# EAGLE board Cricket Game Board (EAGLE 9.6.2)
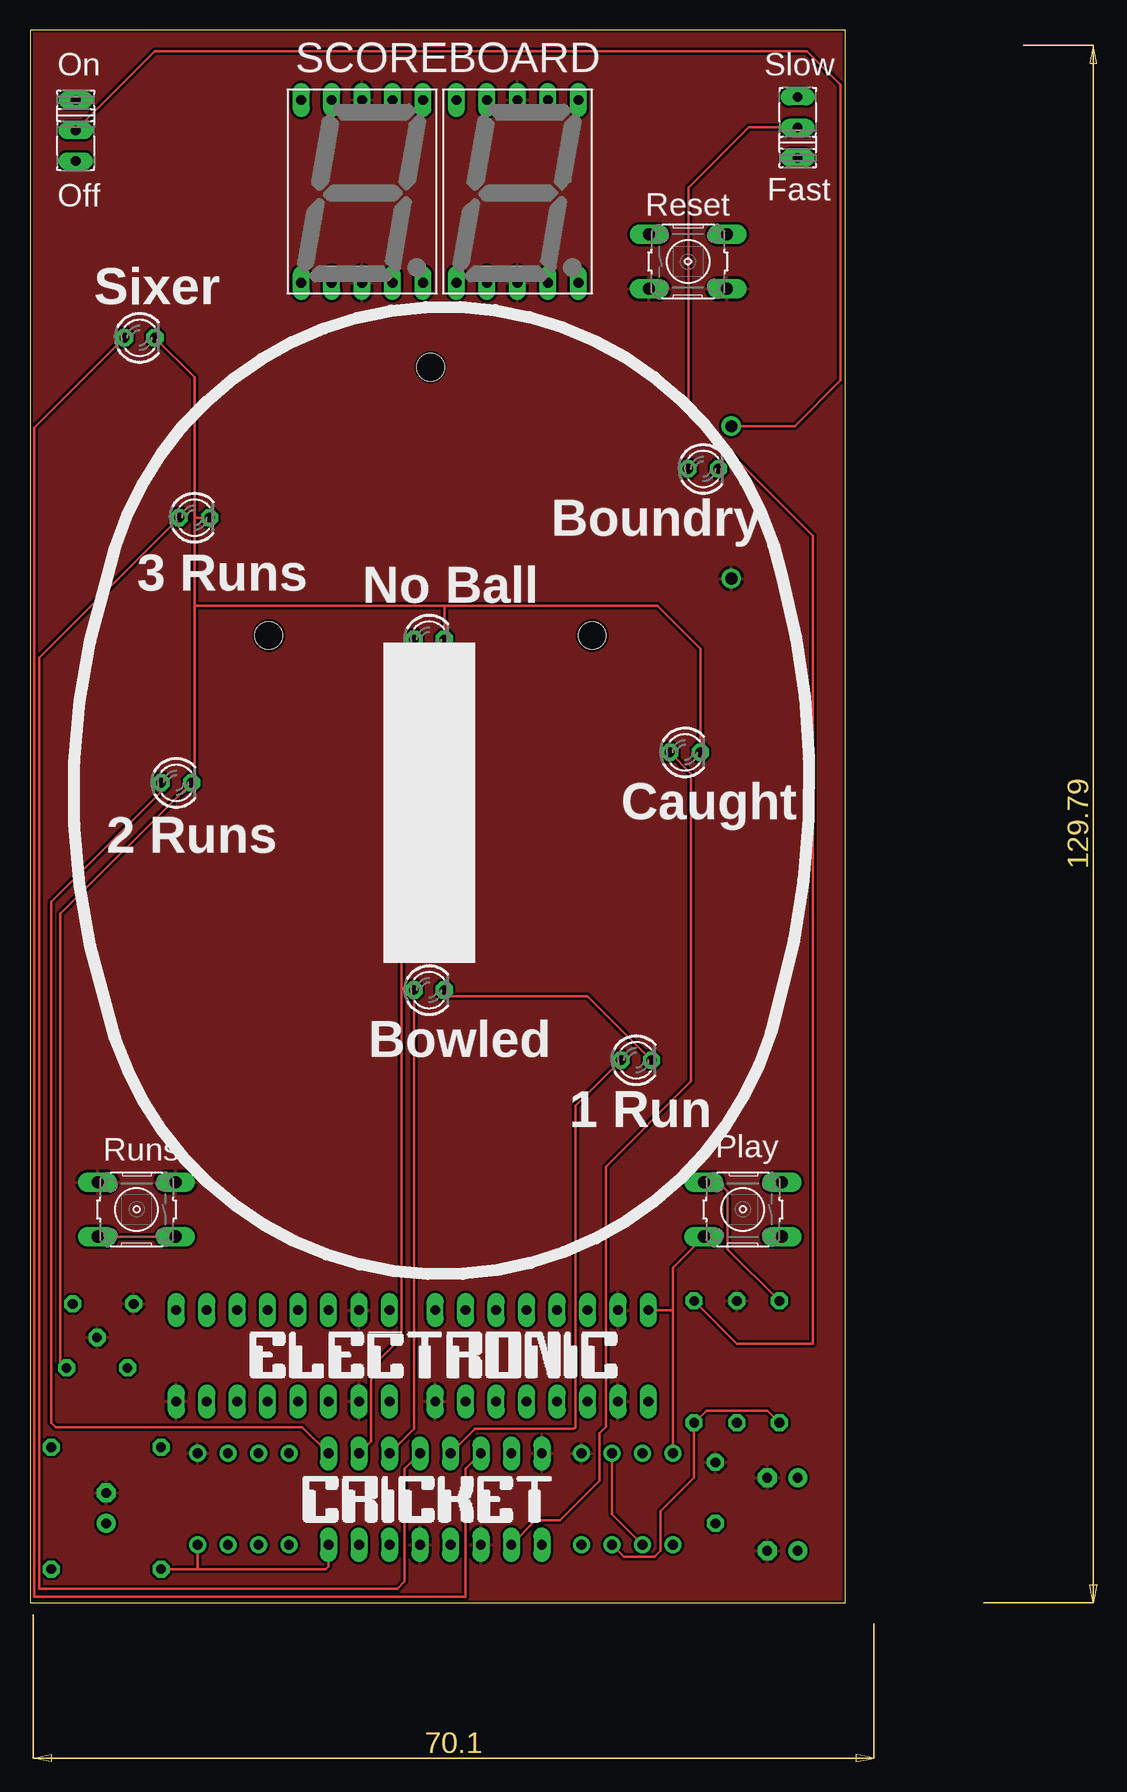
[diagram p0: board, top side]
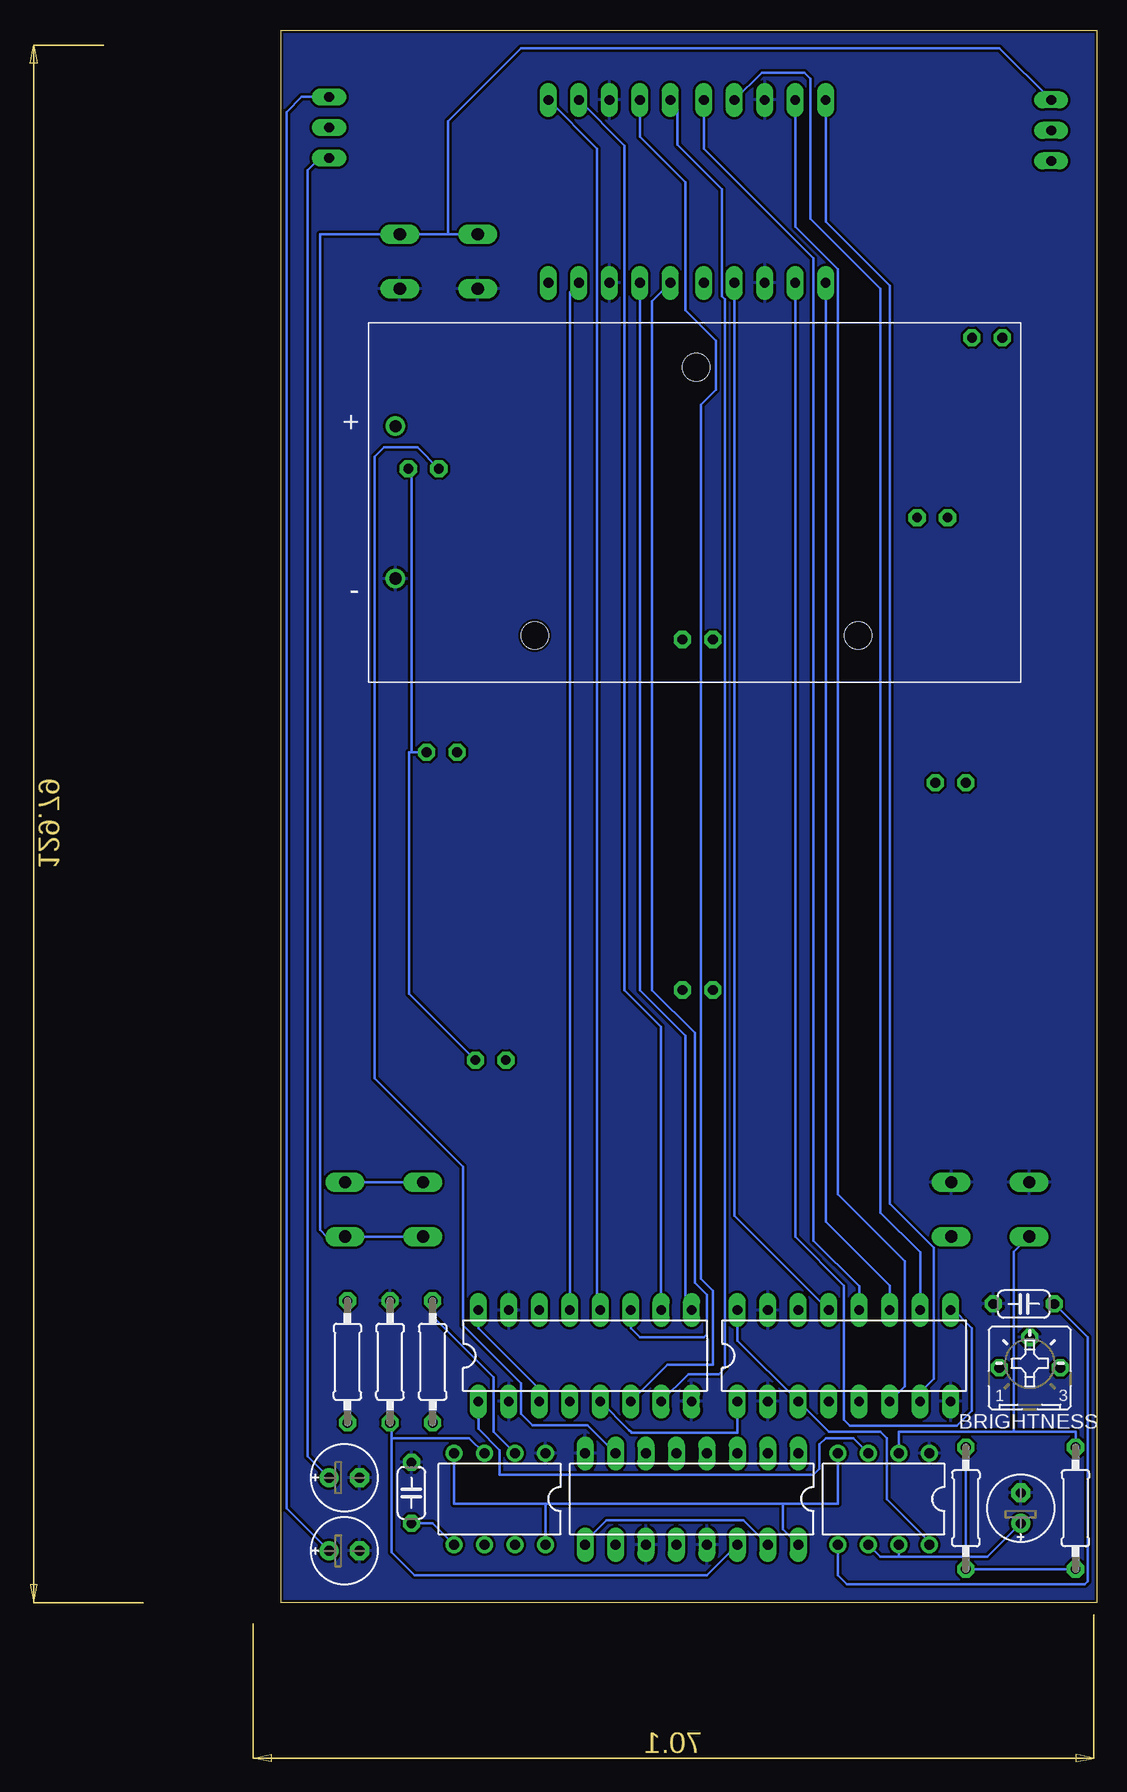
[diagram p1: board, bottom side, seen from below]

Size 68 x 131.05 mm. Coordinates in mm from the lower left corner, seen from the top.
Outline: 0,0 68,0 68,131.05 0,131.05 0,0
Copper layers (1*16): Top 0.035mm / dielectric 1.5mm / Bottom 0.035mm
Design rules "SparkFun": minimum track width 8mil, minimum drill 20mil, track to track 8mil, track to pad 8mil, pad to pad 8mil, via to via 8mil, smd to smd 8mil, copper to edge 8mil, drill to drill 8mil, minimum pad ring 12mil, minimum via ring 10mil, stop-mask expansion 4mil, vias tented up to drill 20mil, thermal gap 10mil

## Footprints (pad centres in the part's own frame; a part is rotated, then mirrored left to right if it is on the bottom)
B25P = drill 0.813 octagon: A -2.54,0; E 2.54,0; S 0,2.54
BAT_BH9VPC = drill 1.016: + 24.945,-6.35; - 24.945,6.35 | hole 2.29: -0.135,-11.26; -13.625,11.09; 13.345,11.09
E2,5-6E = drill 0.813 pad 1.575: + -1.27,0 | drill 0.813 pad 1.575 octagon: - 1.27,0
C050-024X044 = drill 0.813 octagon: 1 -2.54,0; 2 2.54,0
HDSP-M = drill 0.813 long: 1 -5.08,-7.62; 2 -2.54,-7.62; 3 0,-7.62; 4 2.54,-7.62; 5 5.08,-7.62; 6 5.08,7.62; 7 2.54,7.62; 8 0,7.62; 9 -2.54,7.62; 10 -5.08,7.62
M251 = drill 0.813 long: 1 -2.54,0; 2 0,0; 3 2.54,0
DIL08 = drill 0.813 pad 1.27: 1 -3.81,-3.81; 2 -1.27,-3.81; 3 1.27,-3.81; 4 3.81,-3.81; 5 3.81,3.81; 6 1.27,3.81; 7 -1.27,3.81; 8 -3.81,3.81
DIL16 = drill 0.813 long: 1 -8.89,-3.81; 2 -6.35,-3.81; 3 -3.81,-3.81; 4 -1.27,-3.81; 5 1.27,-3.81; 6 3.81,-3.81; 7 6.35,-3.81; 8 8.89,-3.81; 9 8.89,3.81; 10 6.35,3.81; 11 3.81,3.81; 12 1.27,3.81; 13 -1.27,3.81; 14 -3.81,3.81; 15 -6.35,3.81; 16 -8.89,3.81
LED3MM = drill 0.813 octagon: A -1.27,0; K 1.27,0
B3F-10XX = drill 1.016 long: 1 -3.251,2.261; 2 3.251,2.261; 3 -3.251,-2.261; 4 3.251,-2.261
0207/10 = drill 0.813 octagon: 1 -5.08,0; 2 5.08,0

## Placement (x,y rotation side)
BRIGHTNESS  5k  [B25P]  5.59,19.56 0 bottom
BT1  BH9VPC  [BAT_BH9VPC]  33.53,91.69 180 bottom
C1  1uf  [E2,5-6E]  62.74,10.41 0 bottom
C2  3.3uf  [E2,5-6E]  62.74,4.32 0 bottom
C3  1nf  [C050-024X044]  57.15,9.14 270 bottom
C4  1nf  [C050-024X044]  6.1,24.89 0 bottom
C5  10uf  [E2,5-6E]  6.35,7.87 90 bottom
DIS1  HD-H101  [HDSP-M]  40.64,117.6 0 top
DIS2  HD-H101  [HDSP-M]  27.69,117.6 0 top
FAST/SLOW  [M251]  64.01,122.94 90 top
IC1  NE555N  [DIL08]  49.78,8.64 180 bottom
IC2  4017N  [DIL16]  33.78,8.64 180 bottom
IC3  NE555N  [DIL08]  17.78,8.64 180 bottom
IC4  4026N  [DIL16]  21.08,20.57 0 bottom
IC5  4026N  [DIL16]  42.67,20.57 0 bottom
LED1  [LED3MM]  33.27,51.05 0 top
LED2  [LED3MM]  33.27,80.26 0 top
LED3  [LED3MM]  13.72,90.42 0 top
LED4  [LED3MM]  56.13,94.49 0 top
LED5  [LED3MM]  54.61,70.87 0 top
LED6  [LED3MM]  12.19,68.33 0 top
LED7  [LED3MM]  50.55,45.21 0 top
LED8  [LED3MM]  9.14,105.41 0 top
ON/OFF  [M251]  3.81,122.68 270 top
PLAY  [B3F-10XX]  59.44,32.77 180 top
R1  12k  [0207/10]  55.37,20.07 270 bottom
R2  12k  [0207/10]  62.48,20.07 270 bottom
R3  20k  [0207/10]  10.92,7.87 90 bottom
R4  10k  [0207/10]  58.93,20.07 270 bottom
R5  10k  [0207/10]  1.78,7.87 90 bottom
RESET  [B3F-10XX]  54.86,111.76 0 top
RUNS  [B3F-10XX]  8.89,32.77 180 top

## Library data of the parts
BRIGHTNESS = pot
BT1 = BH9VPC; AVAILABILITY: Warning; DESCRIPTION: BATTERY HOLDER 9V PC PIN; MF: MPD (Memory Protection Devices); MP: BH9VPC; PACKAGE: None; PRICE: None; PURCHASE-URL: https://pricing.snapeda.com/search/part/BH9VPC/?ref=eda
C1-C5 = rcl; SPICEPREFIX: C
DIS1 DIS2 = display-hp; OC_FARNELL: unknown; OC_NEWARK: unknown
FAST/SLOW ON/OFF = switches M Dunn
IC1 IC3 = linear
IC2 IC4 IC5 = 40xx
LED1-LED8 = led
PLAY RESET RUNS = switch-omron; MPN: B3F-1000; OC_FARNELL: 176432; OC_NEWARK: 36M3542
R1-R5 = rcl; SPICEPREFIX: R

## Nets
+9V: IC1.4 IC1.8 IC2.16 IC3.4 IC3.8 IC4.3 IC4.16 IC5.3 IC5.16 ON/OFF.1 PLAY.1 PLAY.2 R3.1 R5.1 RESET.1 RESET.2
GND: BRIGHTNESS.S BT1.- C1.- C2.- C3.1 C4.1 C5.- DIS1.3 DIS1.8 DIS2.3 DIS2.8 IC1.1 IC2.8 IC2.11 IC2.13 IC3.1 IC4.2 IC4.8 IC4.15 IC5.2 IC5.8 IC5.15 R4.1 RESET.3 RESET.4 RUNS.3 RUNS.4
N$1: FAST/SLOW.2 IC1.2 IC1.6 R1.1
N$2: C1.+ FAST/SLOW.1
N$3: C2.+ FAST/SLOW.3
N$4: IC1.7 R1.2 R2.2
N$5: IC1.3 IC2.14 R4.2
N$6: PLAY.3 PLAY.4 R2.1
N$7: IC2.9 IC2.15
N$8: IC2.3 LED1.A
N$9: BRIGHTNESS.E LED1.K LED2.K LED3.K LED4.K LED5.K LED6.K LED7.K LED8.K
N$10: IC2.2 LED2.A
N$11: IC2.4 LED3.A
N$12: IC2.7 LED4.A
N$13: IC2.10 LED5.A
N$14: IC2.1 LED6.A
N$15: IC2.5 LED7.A
N$16: IC2.6 LED8.A
N$17: DIS2.7 IC4.10
N$18: DIS2.6 IC4.12
N$19: DIS2.4 IC4.13
N$20: DIS2.2 IC4.9
N$21: DIS2.1 IC4.11
N$22: DIS2.9 IC4.6
N$23: DIS2.10 IC4.7
N$24: DIS1.7 IC5.10
N$25: DIS1.6 IC5.12
N$26: DIS1.4 IC5.13
N$27: DIS1.2 IC5.9
N$28: DIS1.1 IC5.11
N$29: DIS1.9 IC5.6
N$30: DIS1.10 IC5.7
N$31: IC3.3 IC5.1
N$32: IC3.2 R5.2 RUNS.1 RUNS.2
N$33: C3.2 IC1.5
N$34: C4.2 IC3.5
N$35: IC4.1 IC5.5
N$36: C5.+ IC3.6 IC3.7 R3.2
N$37: BT1.+ ON/OFF.2

## Tracks (layer width: path | path; a pad name or v marks a point on that pad's centre or on a via)
+9V
  Top 0.203: 13.97,2.79 24.64,2.79 24.89,3.05 IC2.16 | IC1.4 53.59,24.38 | 53.59,24.38 53.59,27.91 PLAY.2 | 13.97,2.79 R3.1 | IC3.8 13.97,2.79 | IC5.16 53.59,24.38
  Bottom 0.203: 45.97,8.26 IC1.8 45.97,8.13 46.1,8.26 | IC1.4 53.59,8.26 46.1,8.26 | 45.97,8.26 26.16,8.26 | IC3.4 21.59,8.26 26.16,8.26 | 26.16,8.26 26.16,6.1 IC2.16 | 54.1,114.02 RESET.2 64.77,114.02 64.77,31.06 64.21,30.5 PLAY.1 PLAY.2 | 54.1,114.02 RESET.1 | ON/OFF.1 8.13,129.54 48.01,129.54 54.1,123.44 54.1,114.02 | 46.1,8.26 45.97,8.26 | IC5.3 46.48,17.78 51.56,22.86 IC5.16 | IC4.16 29.97,21.84 IC4.3 22.35,14.22 18.03,14.22 17.53,13.72 17.53,8.64 13.97,5.08 IC3.8 | R5.1 R3.1
GND
  pour Top: 0,131.06 68.07,131.06 68.07,0 0,0
  pour Bottom: 0,131.06 68.07,131.06 68.07,0 0,0
N$1
  Top 0.203: IC1.2 48.51,7.37 IC1.6 | FAST/SLOW.2 59.94,122.94 54.91,117.91 54.91,99.26 65.28,88.9 65.28,21.59 58.93,21.59 R1.1
  Bottom 0.203: IC1.2 50.29,14.22 50.29,18.8 55.37,23.88 55.37,24.89 55.24,25.02 R1.1
N$2
  Bottom 0.203: C1.+ 65.79,12.19 65.79,119.38 64.77,120.4 FAST/SLOW.1
N$3
  Bottom 0.203: C2.+ 67.56,7.87 67.56,124.21 66.29,125.48 FAST/SLOW.3
N$4
  Top 0.203: R2.2 61.47,16 56.39,16 R1.2 55.37,10.41 52.58,7.62 52.58,4.32 52.07,3.81 49.53,3.81 IC1.7
N$5
  Bottom 0.203: IC2.14 32.51,2.29 56.9,2.29 58.8,4.19 58.8,13.72 | R4.2 58.8,14.86 58.8,13.72 | IC1.3 52.32,13.72 58.8,13.72
N$6
  Top 0.203: R2.1 58.17,29.46 58.17,34.29 57.43,35.03 PLAY.4
  Bottom 0.203: PLAY.4 PLAY.3
N$7
  Bottom 0.203: IC2.15 29.46,6.86 40.89,6.86 42.67,5.08 IC2.9
N$8
  Top 0.203: IC2.3 32,14.48 LED1.A
N$9
  Top 0.203: LED7.K 46.48,50.55 35.05,50.55 LED1.K | BRIGHTNESS.E 2.54,20.07 2.54,57.4 LED6.K 13.72,68.58 13.72,83.06 | 34.54,83.06 52.32,83.06 55.88,79.5 LED5.K | LED2.K 34.54,83.06 | 34.54,83.06 13.72,83.06 | LED8.K 13.72,102.11 13.72,90.42 | 13.72,83.06 13.72,90.42 | LED3.K 13.72,90.42
  Bottom 0.203: 57.15,70.87 57.35,70.87 57.35,50.75 LED7.K | 57.15,70.87 LED5.K | 57.15,70.87 57.15,94.23 LED4.K
N$10
  Top 0.203: IC2.2 28.45,13.46 28.45,19.56 30.99,22.1 30.99,79.42 31.84,80.26 LED2.A
N$11
  Top 0.203: IC2.4 31.24,11.18 31.24,1.78 30.63,1.17 0.76,1.17 0.76,78.74 LED3.A
N$12
  Bottom 0.203: IC2.7 42.47,14.78 47.04,14.78 48.01,15.75 48.01,18.29 52.83,23.11 52.83,36.32 60.2,43.69 60.2,95.5 59.44,96.27 56.64,96.27 LED4.A
N$13
  Top 0.203: LED5.A 55.12,69.09 55.12,43.43 48.01,36.32 48.01,14.64 47.5,14.14 47.5,10.16 44.2,6.86 42.16,6.86 IC2.10
N$14
  Top 0.203: IC2.1 22.71,14.63 2.13,14.63 1.78,14.99 1.78,58.42 10.92,67.56 LED6.A
N$15
  Top 0.203: LED7.A 45.47,41.4 45.47,14.62 45.33,14.48 37.08,14.48 IC2.5
N$16
  Top 0.203: IC2.6 36.32,11.18 36.32,0.51 0.36,0.51 0.36,97.89 LED8.A
N$17
  Bottom 0.203: DIS2.7 27.94,127.51 24.38,127.51 23.88,127 23.88,115.32 18.03,109.47 18.03,34.29 18.03,32.51 14.73,29.21 IC4.10
N$18
  Bottom 0.203: IC4.12 19.81,26.35 23.62,30.16 23.62,112.01 32.77,121.16 DIS2.6
N$19
  Bottom 0.203: DIS2.4 30.23,32.26 IC4.13
N$20
  Bottom 0.203: IC4.9 12.19,24.64 10.41,22.86 10.41,16 11.68,14.73 20.57,14.73 21.08,15.24 21.08,26.42 25.15,30.48 DIS2.2
N$21
  Bottom 0.203: DIS2.1 22.61,31.75 17.27,26.42 IC4.11
N$22
  Bottom 0.203: IC4.6 16,18.03 16,28.45 21.59,34.04 21.59,111.11 25.15,114.67 DIS2.9
N$23
  Bottom 0.203: DIS2.10 22.61,115.06 17.27,109.73 17.27,33.24 13.61,29.57 13.61,18.65 14.73,17.53 IC4.7
N$24
  Bottom 0.203: IC5.10 36.32,48.01 39.37,51.05 39.37,121.41 DIS1.7
N$25
  Bottom 0.203: IC5.12 41.66,24.38 41.66,121.16 DIS1.6
N$26
  Bottom 0.203: IC5.13 43.94,109.22 DIS1.4
N$27
  Bottom 0.203: IC5.9 34.29,24.89 34.29,47.24 38.1,51.05 DIS1.2
N$28
  Bottom 0.203: DIS1.1 37.08,108.46 37.08,51.05 33.53,47.5 33.53,26.67 32.51,25.65 32.51,22.35 32.77,22.1 38.1,22.1 38.86,22.86 IC5.11
N$29
  Bottom 0.203: IC5.6 35.81,19.81 32,19.81 32,26 33.02,27.01 33.02,99.82 31.75,101.09 31.75,105.16 34.29,107.7 34.29,118.36 38.1,122.17 DIS1.9
N$30
  Bottom 0.203: DIS1.10 34.95,124.61 34.95,121.5 31.24,117.79 31.24,108.85 30.99,108.6 30.99,19.56 31.5,19.05 34.04,19.05 IC5.7
N$31
  Bottom 0.203: IC5.1 51.56,14.48 49.78,12.7 49.78,10.67 23.62,10.67 23.11,11.18 23.11,13.21 22.61,13.72 20.32,13.72 IC3.3
N$32
  Top 0.203: RUNS.2 RUNS.1
  Bottom 0.203: IC3.2 16.51,14.22 6.91,14.22 | R5.2 1.78,14.22 6.91,14.22 | RUNS.2 6.91,29.23 6.91,14.22
N$33
  Bottom 0.203: IC1.5 55.37,6.6 C3.2
N$34
  Bottom 0.203: IC3.5 21.59,2.29 20.83,1.52 1.02,1.52 0.76,1.78 0.76,22.1 C4.2
N$35
  Bottom 0.203: IC5.5 38.99,14.35 38.86,14.22 38.81,14.17 29.97,14.17 IC4.1
N$36
  Bottom 0.203: 16.51,3.81 18.03,3.81 IC3.6 | IC3.7 16.51,3.81 | 16.51,3.81 10.92,3.81 | 10.92,3.81 9.14,3.81 C5.+ | R3.2 10.92,3.81
N$37
  Top 0.203: ON/OFF.2 10.41,129.29 64.77,129.29 67.56,126.49 67.56,101.85 63.75,98.04 BT1.+

## Text on the board
tPlace: SCOREBOARD | On | Slow | Fast | Off | Reset | Sixer | Boundry | 3 Runs | No Ball | Caught | 2 Runs | Bowled | 1 Run | Runs | Play